# Altium PCB OFP_MCM_v1.5.PcbDoc (part 6 of 8)
Units mm, origin at the board's own origin, x right, y up, seen from the top; angles counter-clockwise.
Board outline 110 x 120 mm, 4 copper layers (Top Layer, Layer 1, Layer 2, Bottom Layer), stack 1.576 mm thick; 353 components, 268 nets, 1240 pads, 519 vias.
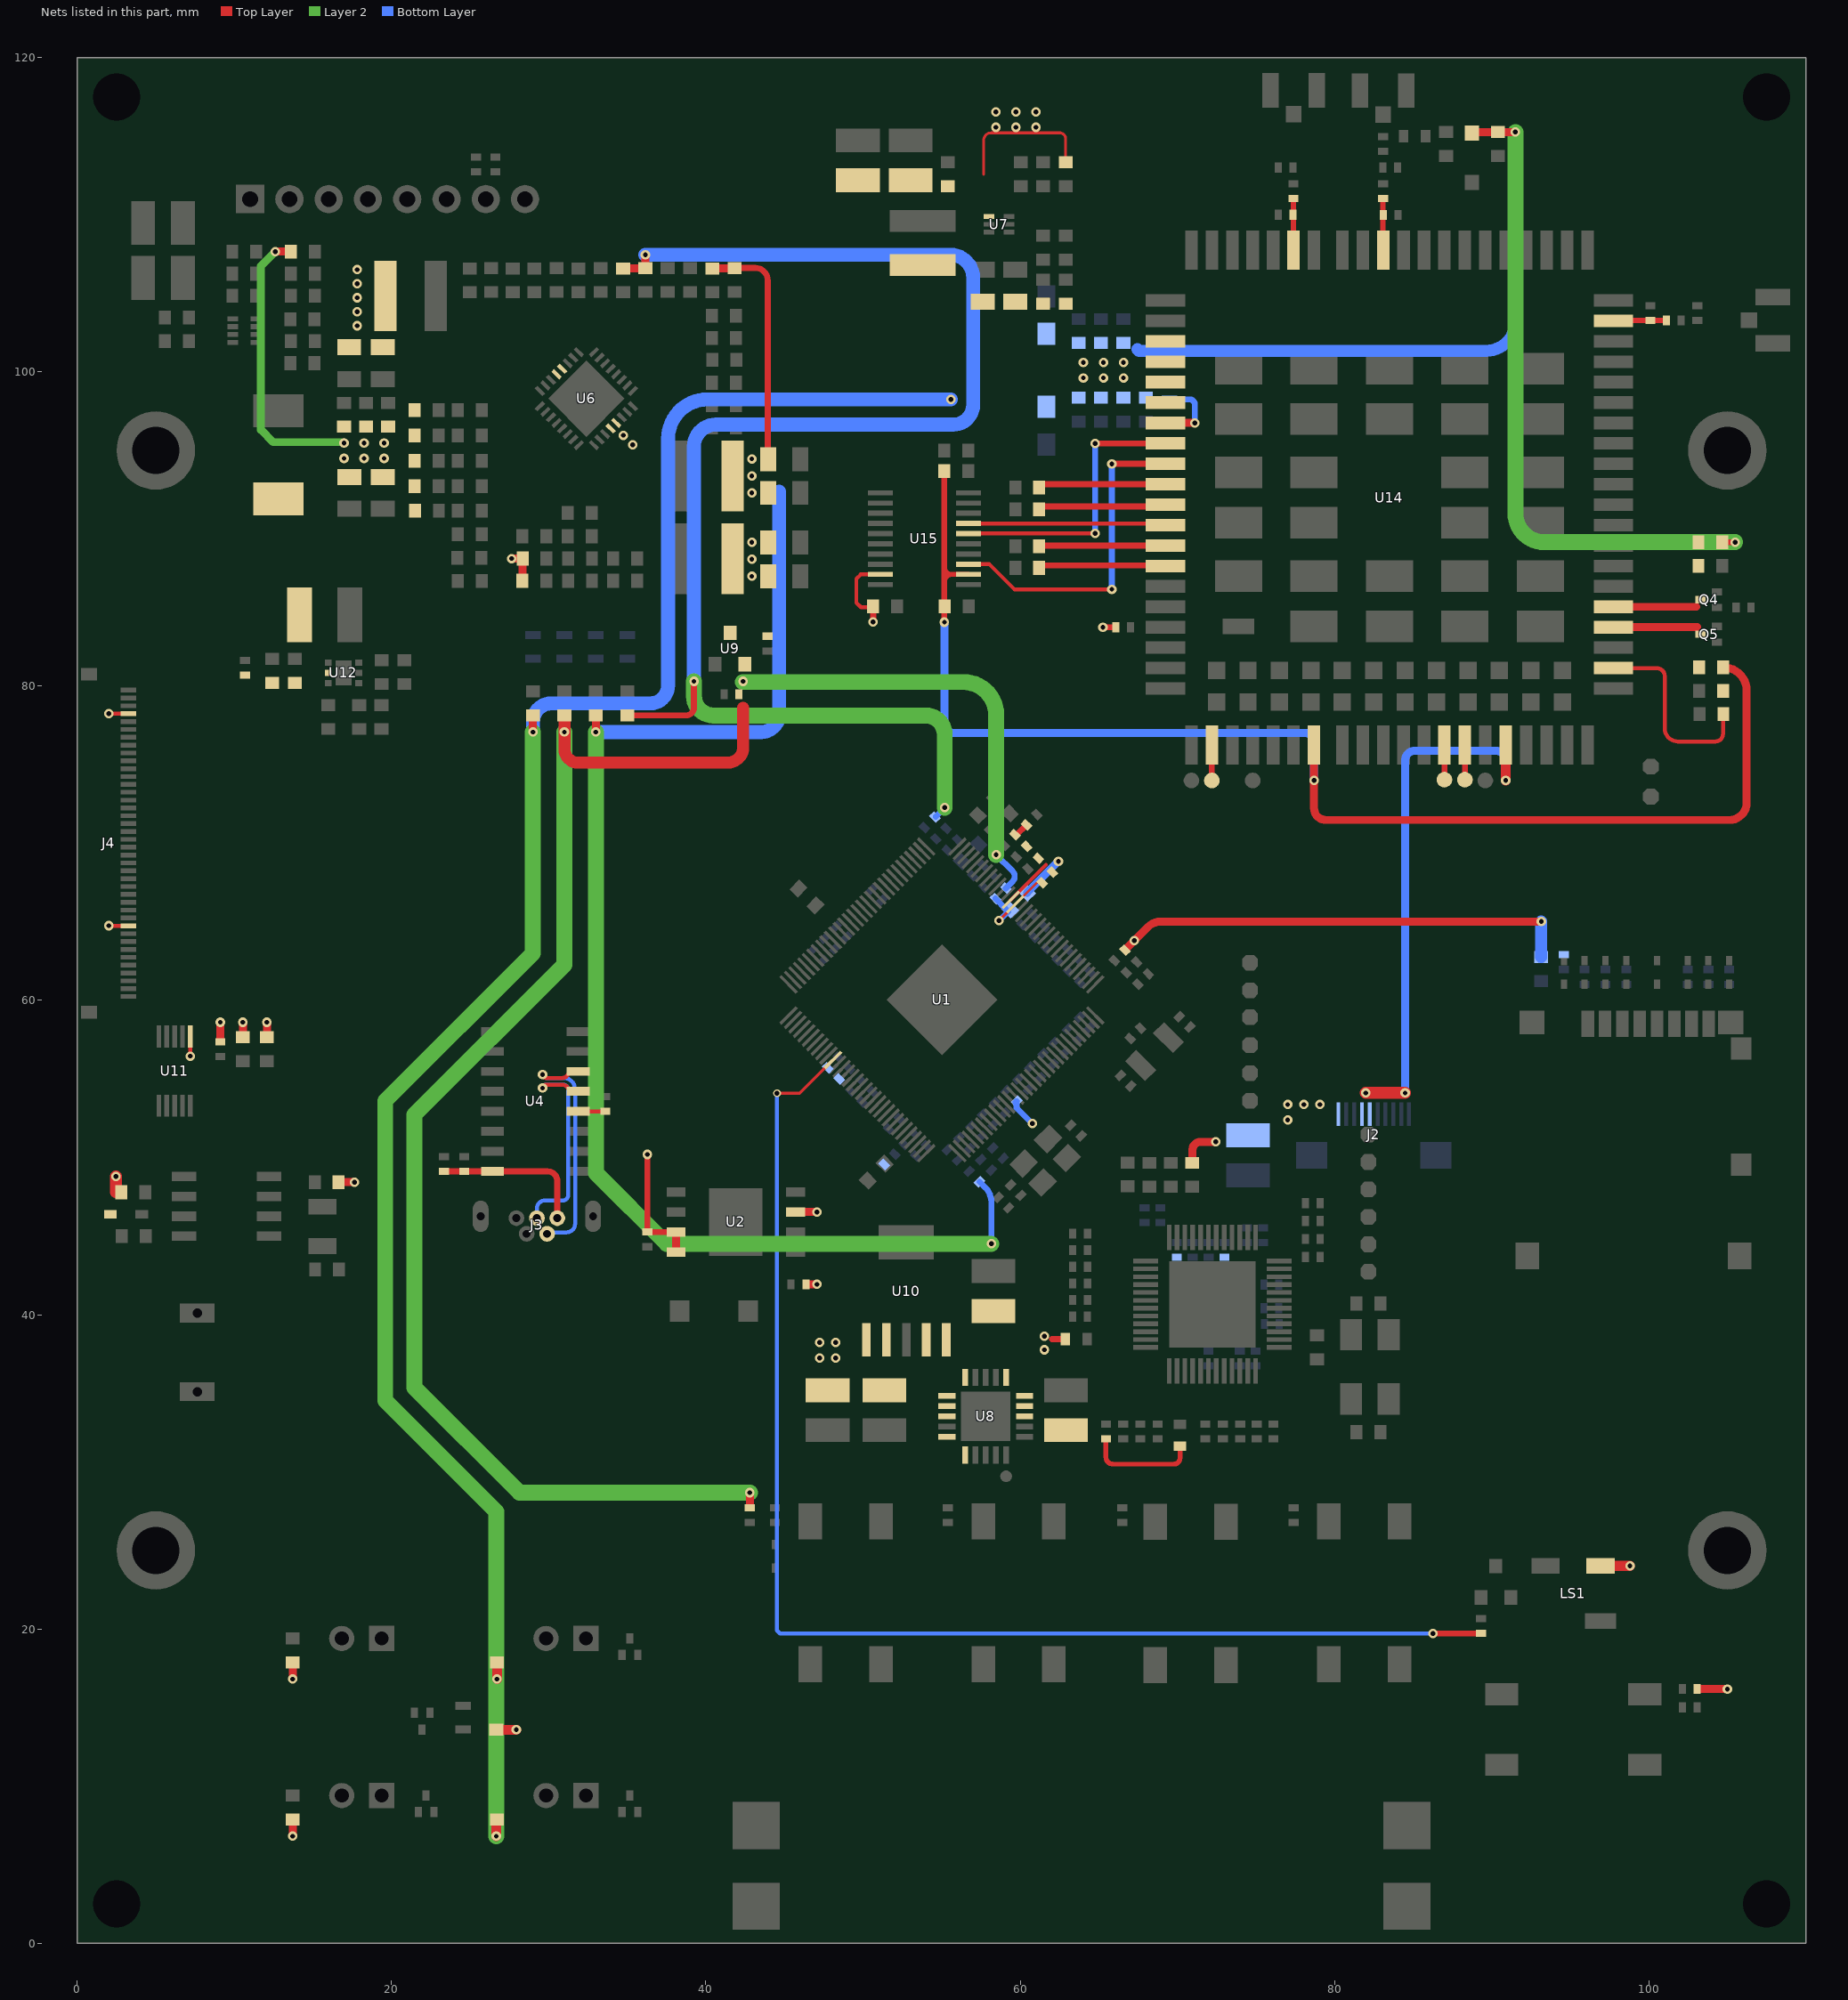
[diagram p4: the nets of this part, all layers, seen from the top]

## Via types
v1: diameter 0.6, hole 0.3, Top Layer to Bottom Layer, tented both sides, 475 vias
v2: diameter 0.5, hole 0.3, Top Layer to Bottom Layer, tented both sides, 44 vias

## Nets (pads, with @x,y where several pads share a name; then routed paths per layer and width w, separated by ;. In a path a pad name is that pad's centre, name@x,y a point inside that pad or via, vN(x,y) a via of type N, cw(c..) or ccw(c..) an arc to the next point about the centre after c; other vN are vias at no path point) (continued)
AP_RDY: (continued)
  Top Layer w0.381: pad.2@72.2,74 U14.2@72.2,76.25
AVCC: C19.2 C20.2 R32.2 R33.1 U1.115 | length 7.7
  Top Layer w0.178: v1(58.648,65.076) U1.115@59.687,66.115 61.133,67.561 61.33,67.561 C19.2@61.371,67.52
  Bottom Layer w0.178: C20.2@59.13,65.78 C20.2@59.352,65.78
  Bottom Layer w0.381: R32.2@58.43,66.48 C20.2@59.13,65.78 ; v1@58.654,65.076 C20.2@59.256,65.679 ; R33.1@59.778,53.588 59.715,53.526 59.715,53.472 59.778,53.409 59.778,53.159 60.317,52.62 v1(60.777,52.161)
B_MASTER: 
BOOT: R110.1 U14.115 | length 12.6
  Top Layer w0.254: U14.115@97.75,81.15 100.511,81.15 cw(c100.511,80.645) 101.016,80.645 101.016,77.318 ccw(c101.854,77.318) 101.854,76.479 104.242,76.479 ccw(c104.242,76.962) 104.724,76.962 104.724,78.207 cw(c104.75,78.207) R110.1@104.75,78.232
BUZZER_EN: R17.1 U1.43 | length 83.5
  Top Layer w0.178: v2(44.529,54.099) 45.974,54.099 U1.43@48.091,56.215
  Top Layer w0.381: v1(86.269,19.704) 86.278,19.713 89.313,19.713 R17.1@89.322,19.722
  Bottom Layer w0.254: v2(44.529,54.099) 44.529,19.907 44.726,19.71 44.882,19.71 86.263,19.71 v1(86.269,19.704)
CH_3.3V: C13.2 U4.4 | length 1.8
  Top Layer w0.254: U4.4@31.873,52.944 C13.2@33.608,52.944 C13.2@33.642,52.979
CH_USB_N: J3.2 U4.6 | length 15.8
  Top Layer w0.254: v1(29.612,55.28) ccw(c29.824,55.28) 29.824,55.069 30.864,55.069 ccw(c30.864,55.484) 31.263,55.37 31.269,55.376 U4.6@31.873,55.484
  Bottom Layer w0.254: v1(29.612,55.28) ccw(c29.824,55.28) 29.824,55.069 30.947,55.069 cw(c30.947,54.332) 31.684,54.332 31.684,45.788 cw(c31.138,45.788) 31.138,45.242 29.991,45.242 J3.2@29.898,45.149
CH_USB_P: J3.3 U4.5 | length 14.3
  Top Layer w0.254: v1(29.612,54.426) cw(c29.824,54.426) 29.824,54.637 30.859,54.637 cw(c30.859,54.214) 31.254,54.367 31.269,54.327 U4.5@31.873,54.214
  Bottom Layer w0.254: J3.3@29.248,46.149 29.248,46.763 cw(c29.748,46.763) 29.748,47.263 30.87,47.263 ccw(c30.87,47.646) 31.252,47.646 31.252,54.295 ccw(c30.91,54.295) 30.91,54.637 29.824,54.637 ccw(c29.824,54.426) v1(29.612,54.426)
DBG_RXD: pad.2@87,74.05 U14.11 | length 2.2
  Top Layer w0.381: pad.2@87,74.05 U14.11@87,76.25
DBG_TXD: pad.2@88.3,74.05 U14.12 | length 2.2
  Top Layer w0.381: pad.2@88.3,74.05 U14.12@88.3,76.25
EC_CTS: R108.1 U14.64 | length 8
  Top Layer w0.381: R108.1@61.214,92.85 U14.64@69.25,92.85
EC_DCD: U14.63 U15.3 | length 21.2
  Top Layer w0.254: U15.3@56.71,87.759 58.041,87.759 59.633,86.167 v1(65.837,86.167)
  Top Layer w0.381: v1(65.837,94.15) U14.63@69.25,94.15
  Bottom Layer w0.381: v1(65.837,86.167) v1(65.837,94.15)
EC_DTR: U14.66 U15.7 | length 12.6
  Top Layer w0.178: U14.66@69.141,90.359 U14.66@69.25,90.25
  Top Layer w0.254: U15.7@56.71,90.359 U14.66@69.141,90.359
EC_PWR: Q4.3 R99.1 R100.1 U14.21 | length 5.3
  Top Layer w0.508: U14.21@97.75,85.05 103.023,85.05
EC_RI: U14.62 U15.6 | length 18.3
  Top Layer w0.178: U15.6@56.71,89.709 U15.6@56.726,89.725
  Top Layer w0.254: U15.6@56.726,89.725 v1(64.775,89.725)
  Top Layer w0.381: v1(64.775,95.45) U14.62@69.25,95.45
  Bottom Layer w0.381: v1(64.775,89.725) v1(64.775,95.45)
EC_RST: Q5.3 R103.1 U14.20 | length 5.3
  Top Layer w0.508: U14.20@97.75,83.75 103.082,83.75
EC_RTS: R107.1 U14.65 | length 8.2
  Top Layer w0.178: R107.1@61.214,91.258 R107.1@61.391,91.435 ; U14.65@69.135,91.435 U14.65@69.25,91.55
  Top Layer w0.381: R107.1@61.391,91.435 U14.65@69.135,91.435
EC_RXD: R105.1 U14.68 | length 8
  Top Layer w0.178: U14.68@69.219,87.681 U14.68@69.25,87.65
  Top Layer w0.381: R105.1@61.214,87.681 U14.68@69.219,87.681
EC_STATUS: LED8.2 U14.61 | length 4.8
  Top Layer w0.178: v1(71.12,96.748) v1@71.12,96.75
  Top Layer w0.508: U14.61@69.25,96.75 v1@71.12,96.75
  Bottom Layer w0.381: LED8.2@69.507,98.248 70.789,98.248 cw(c70.789,97.918) 71.12,97.918 v1(71.12,96.748)
EC_TXD: R106.1 U14.67 | length 8.1
  Top Layer w0.178: R106.1@61.214,89.056 R106.1@61.32,88.95
  Top Layer w0.381: R106.1@61.32,88.95 U14.67@69.25,88.95

## Text inside footprints (layer, text, board x,y; h text height)
J4: Top Overlay "1" at 1.833,60.4 h1 r270
LS1: Top Overlay "+" at 97.242,23.309 h1 r180